# Altium PCB Стенд проверки шлейфов.PcbDoc (part 2 of 3)
Units mm, origin at the board's own origin, x right, y up, seen from the top; angles counter-clockwise.
Board outline 130 x 70 mm, 2 copper layers (Top Layer, Bottom Layer), stack 1.571 mm thick; 262 components, 230 nets, 835 pads, 564 vias.
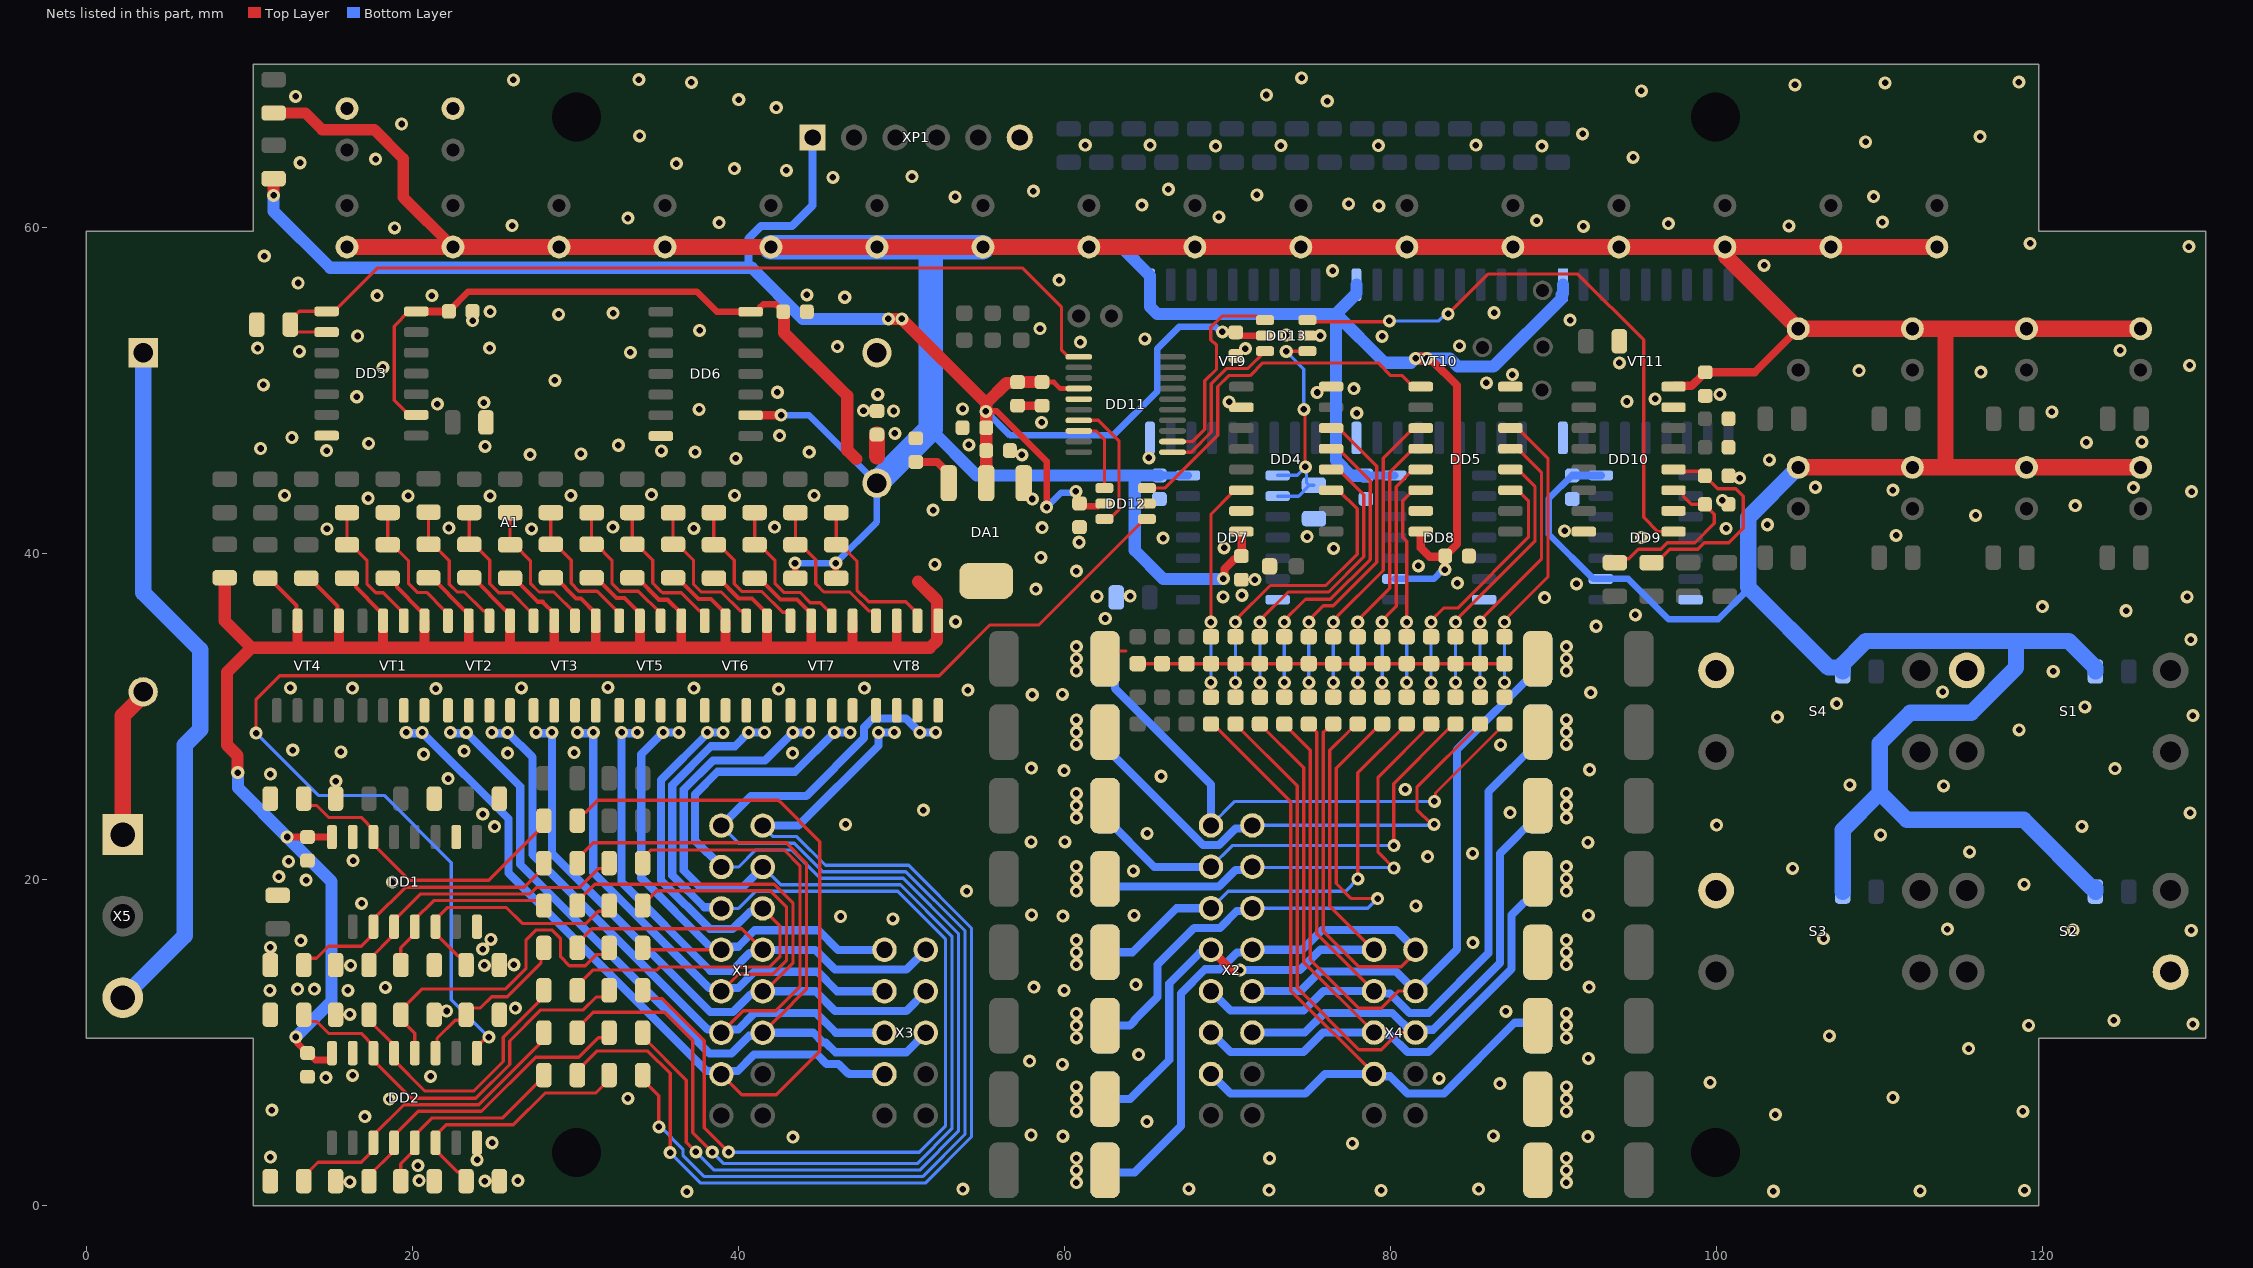
[diagram p2: the nets of this part, all layers, seen from the top]

## Via types
v1: diameter 0.8, hole 0.4, Top Layer to Bottom Layer, tented both sides, 564 vias

## Nets (pads, with @x,y where several pads share a name; then routed paths per layer and width w, separated by ;. In a path a pad name is that pad's centre, name@x,y a point inside that pad or via, vN(x,y) a via of type N, cw(c..) or ccw(c..) an arc to the next point about the centre after c; other vN are vias at no path point) (continued)
3.3V: C13.1 C14.1 C15.2 C16.1 C21.1 C22.1 DA1.2 DA1.4 DD11.4 DD12.5 DD13.5 R157.1 XP1.1 | length 108.1
  Top Layer w0.3: C16.1@58.625,50.5 59.35,50.5 59.75,50.1 DD11.4@60.875,50.1
  Top Layer w0.4: v1(55.181,48.707) 55.843,48.707 58.9,45.65 v1(58.9,42.825) ; v1(60.7,43.8) 60.777,43.723 60.777,43.201 C21.1@60.921,43.056 61.087,42.89 62.04,42.89 62.2,43.05 DD12.5@62.45,43.05 ; v1(69.678,53.572) 69.689,53.561 70.614,53.561 C22.1@70.625,53.55 ; C22.1@70.575,53.575 70.8,53.35 DD13.5@72.3,53.35
  Top Layer w0.75: v1(11.5,61.95) R157.1@11.5,62.975 ; v1(49.2,54.375) v1(50.025,54.375) 55.2,49.2 ; DA1.2@55.2,44.3 C13.1@55.2,46.3 C14.1@55.2,47.7 55.2,49.2 ; C16.1@58.625,50.5 C15.2@57.125,50.5 57.075,50.45 56.45,50.45 55.2,49.2
  Bottom Layer w0.4: v1(55.181,48.707) 56.663,47.225 62.981,47.225 65.7,49.944 65.7,52.55 67.05,53.9 69.243,53.9 69.571,53.572 v1(69.678,53.572) ; v1(58.9,42.825) 59.798,43.723 60.623,43.723 v1(60.7,43.8)
  Bottom Layer w0.5: 40.625,57.7 40.625,59.3 41.4,60.075 43.3,60.075 44.555,61.33 XP1.1@44.555,65.5
  Bottom Layer w0.75: v1(11.5,61.95) 11.5,60.975 14.97,57.505 38.951,57.505 38.959,57.513 39.766,57.513 39.774,57.505 40.82,57.505 43.95,54.375 v1(49.2,54.375) v1(50.025,54.375)
3_IN: R76.1 R87.1 X2.4 X4.4 | length 49
  Top Layer w0.2: R76.1@68.985,29.53 R76.1@69.01,29.53 ; R76.1@69.01,29.63 73.875,24.765 73.875,13.18 X4.4@78.985,8.07
  Bottom Layer w0.5: X2.4@68.985,8.07 70.185,6.87 74.77,6.87 75.97,8.07 X4.4@78.985,8.07 79.124,7.931 79.967,7.931 81.028,6.87 83.27,6.87 87.613,11.213 R87.1@89.025,11.213
3_OUT: R8.1 VT1.7 VT1.8 X1.4 X3.4 | length 78
  Top Layer w0.2: R8.1@30.125,23.6 30.125,23.875 30.35,24.1 30.625,24.1 31.375,24.85 42.45,24.85 42.55,24.75 42.566,24.75 45,22.316 45,9.475 42.325,6.8 40.22,6.8 X1.4@38.96,8.06
  Bottom Layer w0.5: v1@19.635,28.964 v1@20.605,28.964 ; v1(20.605,29.014) 25.9,23.719 25.9,20.4 38.049,8.251 38.769,8.251 X1.4@38.96,8.06 39.151,8.251 39.961,8.251 40.97,9.26 44.84,9.26 45.415,8.685 46.144,8.685 46.729,8.1 46.81,8.1 ; 46.81,8.06 X3.4@48.96,8.06
  other v1: 19.635,29.014
3_SIG: R18.1 R39.1 VT1.2 | length 8.5
  Top Layer w0.2: R39.1@16,42.5 R18.1@16,40.525 16.275,40.525 17.225,39.575 17.225,38.125 17.775,37.575 18.224,37.575 19.485,36.314 VT1.2@19.485,35.864
3А: DD1.14 R2.1 R8.2 | length 19
  Top Layer w0.2: R2.1@13.35,24.95 13.35,24.902 13.715,24.537 14.132,24.537 14.867,23.802 16.868,23.802 17.62,23.05 DD1.14@17.62,22.6 17.62,22.15 19.82,19.95 24.7,19.95 28.075,23.325 R8.2@28.075,23.6
3В: DD4.14 R73.1 R76.2 | length 14.4
  Top Layer w0.2: R76.2@68.985,31.18 v1@68.985,32.03 ; R73.1@68.985,34.88 v1@68.985,35.73 ; v1@68.985,35.88 68.985,42.396 70.2,43.611 70.2,43.643 70.427,43.87 DD4.14@70.85,43.87
  Bottom Layer w0.2: v1@68.985,32.18 v1@68.985,35.88
  other v1: 68.985,32.08 68.985,35.78
4_IN: R77.1 R89.1 X2.5 X4.5 | length 55.7
  Top Layer w0.2: R77.1@70.485,29.53 74.275,25.74 74.275,13.346 78.061,9.56 79.42,9.56 80.47,10.61 X4.5@81.525,10.61
  Bottom Layer w0.5: X2.5@71.525,10.61 74.735,10.61 75.935,11.81 80.1,11.81 81.3,10.61 X4.5@81.525,10.61 81.693,10.778 82.598,10.778 86.7,14.88 86.7,21.588 89.025,23.913 R89.1@89.025,24.713
4_OUT: R9.1 VT2.5 VT2.6 X1.5 X3.5 | length 68.4
  Top Layer w0.2: R9.1@30.125,21 30.125,21.275 31.1,22.25 42.925,22.25 44.175,21 44.175,13.259 42.466,11.55 42.45,11.55 X1.5@41.5,10.6
  Bottom Layer w0.5: v1@22.345,28.964 v1@23.315,28.964 ; v1(23.315,29.014) 26.625,25.704 26.625,20.925 38.225,9.325 39.575,9.325 40.659,10.409 41.309,10.409 X1.5@41.5,10.6 44.594,10.6 45.194,10 45.356,10 45.956,9.4 50.3,9.4 X3.5@51.5,10.6
  other v1: 22.345,29.014
4_SIG: R19.1 R44.1 VT2.4 | length 8.7
  Top Layer w0.2: R44.1@18.5,42.5 R19.1@18.5,40.525 18.775,40.525 19.775,39.525 19.775,38.125 20.3,37.6 20.882,37.6 21.968,36.514 22.195,36.287 VT2.4@22.195,35.864
4А: DD1.3 R3.1 R9.2 | length 18
  Top Layer w0.2: R3.1@13.35,14.75 13.35,14.798 13.715,15.162 14.132,15.162 14.867,15.898 16.868,15.898 17.62,16.65 DD1.3@17.62,17.1 17.62,17.55 19.595,19.525 26.875,19.525 28.075,20.725 R9.2@28.075,21
4В: DD4.3 R74.1 R77.2 | length 19.4
  Top Layer w0.2: R77.2@70.485,31.18 v1@70.485,32.03 ; R74.1@70.485,34.88 v1@70.485,35.73 ; v1@70.485,35.88 72.63,38.025 76.031,38.025 77.95,39.944 77.95,42.72 76.8,43.87 DD4.3@76.35,43.87
  Bottom Layer w0.2: v1@70.485,32.18 v1@70.485,35.88
  other v1: 70.485,32.08 70.485,35.78
5_IN: R78.1 R91.1 X2.6 X4.6 | length 50.2
  Top Layer w0.2: R78.1@71.985,29.53 74.675,26.84 74.675,14.92 X4.6@78.985,10.61
  Bottom Layer w0.5: X2.6@68.985,10.61 70.185,9.41 74.66,9.41 75.86,10.61 X4.6@78.985,10.61 79.124,10.471 79.967,10.471 81.028,9.41 82.335,9.41 87.425,14.5 87.425,17.813 89.025,19.413 R91.1@89.025,20.213
5_OUT: R10.1 VT2.7 VT2.8 X1.6 X3.6 | length 60.1
  Top Layer w0.2: R10.1@34.125,21 34.125,21.275 34.66,21.81 42.799,21.81 43.775,20.834 43.775,13.425 42.3,11.95 40.31,11.95 X1.6@38.96,10.6
  Bottom Layer w0.5: v1@24.885,28.964 v1@25.855,28.964 ; v1(25.855,29.014) 27.375,27.494 27.375,21.525 38.109,10.791 38.769,10.791 X1.6@38.96,10.6 39.151,10.791 39.994,10.791 41.003,11.8 44.775,11.8 45.975,10.6 X3.6@48.96,10.6
  other v1: 24.885,29.014
5_SIG: R20.1 R40.1 VT2.2 | length 8.7
  Top Layer w0.2: R40.1@21,42.525 R20.1@21,40.55 21.275,40.55 22.275,39.55 22.275,38.1 22.75,37.625 23.2,37.625 24.355,36.47 24.539,36.47 24.735,36.274 VT2.2@24.735,35.864
5V: A1.3 C1.1 C2.1 C3.1 C4.1 C5.1 C6.1 C7.1 C8.1 C9.1 C10.1 C11.1 C12.1 DA1.3 DD1.16 DD2.16 DD3.9 DD3.14 DD4.16 DD5.16 DD6.9 DD6.14 DD7.9 DD7.14 DD8.9 DD8.14 DD9.9 DD9.14 DD10.16 HL1.2 HL2.2 HL3.2 HL4.2 HL5.2 HL6.2 HL7.2 HL8.2 HL9.2 HL10.2 HL11.2 HL12.2 HL13.2 HL14.2 HL15.2 HL16.2 HL17.2 HL18.2 HL19.2 HL20.2 HL21.2 HL22.2 HL23.2 HL24.2 R17.2 R18.2 R19.2 R20.2 R21.2 R22.2 R35.2 R36.2 R46.2 R47.2 R48.2 R49.2 R50.2 R51.2 R71.2 R72.2 R158.1 R169.1 R170.1 R171.1 R172.1 VT1.1 VT1.3 VT2.1 VT2.3 VT3.1 VT3.3 VT4.1 VT4.3 VT5.1 VT5.3 VT6.1 VT6.3 VT7.1 VT7.3 VT8.1 VT8.3 VT9.10 VT10.10 VT11.10 | length 635.7
  Top Layer w0.2: DD2.16@14.884,8.925 15.08,9.121 DD2.16@15.08,9.35 ; DD3.9@20.25,48.485 19.8,48.485 18.9,49.385 18.9,53.935 19.8,54.835 DD3.14@20.25,54.835
  Top Layer w0.25: R36.2@11,38.475 11.214,38.475 12.899,36.79 12.899,35.93 VT4.3@12.965,35.864 ; 12.945,34.2 12.965,34.22 ; R17.2@13.5,38.475 13.714,38.475 15.419,36.77 15.419,35.95 VT4.1@15.505,35.864 ; R18.2@16,38.475 16.214,38.475 16.555,38.134 16.555,37.92 18.001,36.474 18.042,36.474 18.215,36.301 VT1.3@18.215,35.864 ; R19.2@18.5,38.475 18.714,38.475 19.055,38.134 19.055,37.92 20.501,36.474 20.582,36.474 20.755,36.301 VT1.1@20.755,35.864 ; R20.2@21,38.5 21.214,38.5 23.24,36.474 23.292,36.474 23.465,36.301 VT2.3@23.465,35.864 ; R21.2@23.5,38.5 23.714,38.5 25.74,36.474 25.832,36.474 26.005,36.301 VT2.1@26.005,35.864 ; R22.2@26,38.475 26.25,38.475 27.7,37.025 28.004,37.025 28.715,36.314 VT3.3@28.715,35.864 ; R46.2@28.5,38.5 28.775,38.5 30.05,37.225 30.344,37.225 31.255,36.314 VT3.1@31.255,35.864 ; R47.2@31,38.5 31.275,38.5 32.525,37.25 33.029,37.25 33.965,36.314 VT5.3@33.965,35.864 ; R48.2@33.5,38.5 33.775,38.5 35.125,37.15 35.669,37.15 36.505,36.314 VT5.1@36.505,35.864 ; R49.2@36,38.5 36.249,38.5 37.549,37.2 38.329,37.2 39.215,36.314 VT6.3@39.215,35.864 ; R50.2@38.5,38.475 38.775,38.475 40.025,37.225 40.844,37.225 41.755,36.314 VT6.1@41.755,35.864 ; R51.2@41,38.475 41.275,38.475 42.575,37.175 43.604,37.175 44.465,36.314 VT7.3@44.465,35.864
  Top Layer w0.4: v1(12.325,22.6) C1.1@13.58,22.6 DD1.16@15.08,22.6 ; v1(12.863,10.336) 12.939,10.259 12.939,9.981 13.33,9.59 13.33,9.582 13.562,9.35 C2.1@13.57,9.35 ; C2.1@13.623,9.35 14.048,8.925 DD2.16@14.884,8.925 ; C5.1@22.25,54.835 22.25,54.86 23.44,56.05 37.45,56.05 38.69,54.81 41.2,54.81 41.3,54.91 41.3,55.041 41.534,55.275 42.285,55.275 42.508,55.052 42.526,55.052 42.75,54.828 C6.1@42.75,54.81 ; v1(43.475,39.4) 43.487,39.388 43.487,38.488 R71.2@43.5,38.475 ; v1(45.975,39.4) 45.987,39.388 45.987,38.488 R72.2@46,38.475
  Top Layer w0.5: DD3.14@20.25,54.835 C5.1@22.25,54.835 ; DD6.9@40.75,48.46 40.758,48.468 42.617,48.468 v1(42.625,48.475) ; C11.1@50.875,45.6 52.2,45.6 52.9,44.9 DA1.3@52.9,44.3 ; v1(69.75,38.45) 69.807,38.507 69.807,39.032 70.43,39.655 70.675,39.655 C3.1@70.85,39.83 ; C3.1@70.875,39.83 DD4.16@70.875,41.33 ; DD5.16@81.85,41.33 81.85,41.282 81.852,41.28 81.852,40.323 82.384,39.791 83.175,39.791 83.214,39.83 C4.1@83.35,39.83 ; v1(82.219,51.95) 82.301,51.95 82.451,51.8 82.582,51.8 84.075,50.307 84.075,40.563 83.875,40.363 83.875,40.355 83.55,40.03 83.525,40.03 83.35,39.855 C4.1@83.35,39.83 ; v1(83.325,39) 83.337,39.013 83.337,39.818 C4.1@83.35,39.83 ; DD10.16@97.35,50.22 97.4,50.27 98.462,50.27 98.767,50.575 98.775,50.575 99.1,50.9 99.1,50.925 99.275,51.1 C12.1@99.3,51.1 102.33,51.1 HL21.2@105,53.77
  Top Layer w0.6: 12.965,34.22 VT4.3@12.965,35.864 ; VT4.1@15.505,35.864 15.505,34.22 15.525,34.2 ; VT1.3@18.215,35.864 18.215,34.23 18.245,34.2 ; 20.6,34.2 20.755,34.355 VT1.1@20.755,35.864 ; 23.4,34.2 23.465,34.265 VT2.3@23.465,35.864 ; 26,34.2 26.005,34.205 VT2.1@26.005,35.864 ; 28.45,34.2 28.715,34.465 VT3.3@28.715,35.864 ; 31.175,34.2 31.255,34.28 VT3.1@31.255,35.864 ; 33.901,34.2 33.965,34.264 VT5.3@33.965,35.864 ; 36.372,34.2 36.505,34.332 VT5.1@36.505,35.864 ; 39.15,34.2 39.215,34.265 VT6.3@39.215,35.864 ; VT6.1@41.755,35.864 41.755,34.288 41.843,34.2 ; 44.252,34.2 44.465,34.413 VT7.3@44.465,35.864 ; 46.904,34.2 47.005,34.301 VT7.1@47.005,35.864 ; 49.667,34.2 49.715,34.248 VT8.3@49.715,35.864
  Top Layer w0.7: R158.1@11.5,67 13.45,67 14.47,65.98 17.67,65.98 19.442,64.208 19.442,61.838 HL2.2@22.5,58.78
  Top Layer w0.75: R35.2@8.5,38.5 8.5,37.425 8.5,36.65 8.5,35.85 10.15,34.2 ; v1(9.3,26.55) 9.29,26.56 9.29,27.599 8.65,28.24 8.65,32.7 10.15,34.2 ; C6.1@42.75,54.81 42.8,54.76 42.8,53.53 46.675,49.655 46.675,46.325 47.225,45.775 ; 51.025,38.25 52.18,37.095 52.18,34.639 51.741,34.2 49.667,34.2 46.904,34.2 44.252,34.2 41.843,34.2 39.15,34.2 36.372,34.2 33.901,34.2 31.175,34.2 28.45,34.2 26,34.2 23.4,34.2 20.6,34.2 18.245,34.2 15.525,34.2 12.945,34.2 10.15,34.2 ; v1(81.535,51.95) v1(82.219,51.95)
  Top Layer w1: HL1.2@16,58.78 HL2.2@22.5,58.78 HL3.2@29,58.78 HL4.2@35.5,58.78 HL5.2@42,58.78 HL6.2@48.5,58.78 HL7.2@55,58.78 HL8.2@61.5,58.78 HL9.2@68,58.78 HL10.2@74.5,58.78 HL11.2@81,58.78 HL12.2@87.5,58.78 HL13.2@94,58.78 HL14.2@100.5,58.78 ; 48.5,45.95 C10.1@48.5,47.275 ; HL17.2@105,45.27 HL18.2@112,45.27 114.065,45.27 ; HL16.2@113.5,58.78 HL15.2@107,58.78 HL14.2@100.5,58.78 ; HL20.2@126,45.27 HL19.2@119,45.27 114.065,45.27 ; HL24.2@126,53.77 114.025,53.77 ; HL14.2@100.5,58.78 100.577,58.703 100.577,58.193 HL21.2@105,53.77 114.025,53.77 ; 114.025,53.77 114.025,45.31 114.065,45.27
  Bottom Layer w0.4: v1(42.625,48.475) 44.325,48.475 A1.3@48.5,44.3 48.5,41.925 v1(45.975,39.4) v1(43.475,39.4) ; DD8.9@80.235,38.425 82.642,38.425 83.217,39 v1(83.325,39) ; C9.1@91.145,44.775 91.12,44.775 89.7,43.355 89.7,41.17 92.445,38.425 DD9.9@92.895,38.425 94.575,38.425 97.05,35.95 100.1,35.95 101.925,37.775 101.925,37.925
  Bottom Layer w0.5: C7.1@65.825,44.775 DD7.14@67.575,44.775 ; C8.1@78.485,44.775 DD8.14@80.235,44.775 ; C9.1@91.145,44.775 DD9.14@92.895,44.775
  Bottom Layer w0.75: v1(9.3,26.55) 9.31,26.54 9.31,25.615 v1(12.325,22.6) 15.05,19.875 15.05,12.523 v1(12.863,10.336) ; 51.8,47.6 54.625,44.775 64.305,44.775 ; HL8.2@61.5,58.78 63.49,58.78 65.245,57.025 65.245,55.114 65.684,54.675 76.655,54.675 ; C7.1@65.825,44.775 64.305,44.775 ; v1(69.75,38.45) 69.736,38.45 69.711,38.425 66.06,38.425 64.305,40.18 64.305,44.775 ; VT10.10@77.905,56.475 77.905,55.925 76.655,54.675 ; C8.1@78.47,44.76 77.585,44.76 76.655,45.69 76.655,54.675 ; VT11.10@90.565,56.475 90.565,55.925 90.49,55.85 90.49,55.628 86.312,51.45 84.116,51.45 83.626,51.94 82.229,51.94 v1(82.219,51.95) 81.522,51.95 81.258,51.687 79.643,51.687 76.655,54.675
  Bottom Layer w1: HL17.2@105,45.27 101.925,42.195 101.925,37.925 106.85,33 R172.1@107.7,33 ; R171.1@107.725,19.25 107.725,23.028 110.002,25.304 ; R172.1@107.725,32.75 107.725,33.2 109.14,34.615 118.35,34.615 ; R170.1@123.225,19.25 123.225,19.475 123.2,19.5 122.975,19.5 118.825,23.65 111.656,23.65 110.002,25.304 ; R169.1@123.225,32.75 123.225,32.975 121.585,34.615 118.35,34.615 ; 110.002,25.304 110.002,28.352 111.875,30.225 115.6,30.225 118.35,32.975 118.35,34.615
  Bottom Layer w1.5: HL5.2@42,58.78 HL6.2@48.5,58.78 51.775,58.78 ; A1.3@48.5,44.3 51.8,47.6 51.8,58.755 51.775,58.78 ; HL7.2@55,58.78 51.775,58.78
5А: DD1.4 R4.1 R10.2 | length 18
  Top Layer w0.2: R4.1@17.35,14.75 17.35,15.083 18.89,16.623 18.89,17.523 19.117,17.75 19.149,17.75 20.499,19.1 27.194,19.1 27.594,19.5 30.25,19.5 31.417,20.667 31.742,20.667 R10.2@32.075,21
5В: DD4.4 R75.1 R78.2 | length 19.8
  Top Layer w0.2: R78.2@71.985,31.18 v1@71.985,32.03 ; R75.1@71.985,34.88 v1@71.985,35.73 ; v1@71.985,35.88 73.73,37.625 76.197,37.625 78.35,39.778 78.35,43.59 76.8,45.14 DD4.4@76.35,45.14
  Bottom Layer w0.2: v1@71.985,32.18 v1@71.985,35.88
  other v1: 71.985,32.08 71.985,35.78
6_IN: R98.1 R103.1 X2.7 X4.7 | length 57.9
  Top Layer w0.2: R98.1@73.485,29.515 75.075,27.925 75.075,15.086 78.061,12.1 79.42,12.1 80.47,13.15 X4.7@81.525,13.15
  Bottom Layer w0.5: X2.7@71.525,13.15 74.475,13.15 75.675,14.35 80.325,14.35 X4.7@81.525,13.15 84.075,15.7 84.075,27.963 89.025,32.913 R103.1@89.025,33.713
6_OUT: R11.1 VT3.5 VT3.6 X1.7 X3.7 | length 57.5
  Top Layer w0.2: R11.1@30.125,18.4 30.125,18.65 31.185,19.71 42.198,19.71 43.35,18.558 43.35,14.859 41.631,13.14 X1.7@41.5,13.14
  Bottom Layer w0.5: v1@27.595,28.964 v1@28.565,28.964 ; v1(28.565,29.014) 28.565,21.585 38.275,11.875 39.675,11.875 40.749,12.949 41.309,12.949 X1.7@41.5,13.14 44.735,13.14 45.935,11.94 50.3,11.94 X3.7@51.5,13.14
  other v1: 27.595,29.014
6_SIG: R21.1 R45.1 VT3.4 | length 8.6
  Top Layer w0.2: R45.1@23.5,42.5 R21.1@23.5,40.55 23.775,40.55 24.75,39.575 24.75,38.125 25.3,37.575 26.1,37.575 27.192,36.483 27.249,36.483 27.479,36.253 VT3.4@27.479,36.196
6А: DD1.5 R5.1 R11.2 | length 11.7
  Top Layer w0.2: R5.1@19.3,14.75 19.3,15.8 20.16,16.66 DD1.5@20.16,17.1 20.16,17.55 21.31,18.7 27.775,18.7 R11.2@28.075,18.4
6В: DD4.5 R93.1 R98.2 | length 20.3
  Top Layer w0.2: R98.2@73.485,31.18 v1@73.485,32.03 ; R93.1@73.485,34.88 v1@73.485,35.73 ; v1@73.485,35.88 74.78,37.175 76.312,37.175 78.75,39.613 78.75,44.46 76.8,46.41 DD4.5@76.35,46.41
  Bottom Layer w0.2: v1@73.485,32.18 v1@73.485,35.88
  other v1: 73.485,32.08 73.485,35.78
7_IN: R99.1 R105.1 X2.8 X4.8 | length 53.2
  Top Layer w0.2: R99.1@74.985,29.63 74.985,29.528 75.475,29.038 75.475,16.66 X4.8@78.985,13.15
  Bottom Layer w0.5: X2.8@68.985,13.15 70.185,11.95 74.675,11.95 75.875,13.15 X4.8@78.985,13.15 79.124,13.011 79.967,13.011 81.163,11.815 82.34,11.815 86,15.475 86,25.388 89.025,28.413 R105.1@89.025,29.213
7_OUT: R12.1 VT3.7 VT3.8 X1.8 X3.8 | length 49.1
  Top Layer w0.2: R12.1@34.125,18.4 34.125,18.448 34.987,19.31 41.965,19.31 42.95,18.325 42.95,15.025 42.115,14.19 40.01,14.19 X1.8@38.96,13.14
  Bottom Layer w0.5: v1@30.135,28.964 v1@31.105,28.964 ; v1(31.105,29.014) 31.105,20.42 38.194,13.331 38.769,13.331 X1.8@38.96,13.14 39.151,13.331 39.994,13.331 41.003,14.34 44.86,14.34 46.06,13.14 X3.8@48.96,13.14
  other v1: 30.135,29.014
7_SIG: R22.1 R41.1 VT3.2 | length 9
  Top Layer w0.2: R41.1@26,42.5 R22.1@26,40.525 26.275,40.525 27.25,39.55 27.25,38.15 27.775,37.625 28.674,37.625 29.985,36.314 VT3.2@29.985,35.864
7А: DD1.6 R6.1 R12.2 | length 15.5
  Top Layer w0.2: R6.1@23.3,14.75 23.3,14.951 22.935,15.315 22.792,15.315 21.43,16.677 21.43,17.55 22.155,18.275 25.781,18.275 26.756,17.3 30.675,17.3 31.417,18.042 31.717,18.042 R12.2@32.075,18.4
7В: DD4.6 R94.1 R99.2 | length 20.7
  Top Layer w0.2: R99.2@74.985,31.18 v1@74.985,32.03 ; R94.1@74.985,34.88 v1@74.985,35.73 ; v1@74.985,35.88 75.88,36.775 76.478,36.775 79.15,39.447 79.15,45.35 76.953,47.547 76.483,47.547 DD4.6@76.35,47.68
  Bottom Layer w0.2: v1@74.985,32.18 v1@74.985,35.88
  other v1: 74.985,32.08 74.985,35.78
8_IN: R100.1 R107.1 X2.9 X4.9 | length 50.6
  Top Layer w0.2: 76.01,29.155 75.875,29.02 75.875,16.826 78.061,14.64 80.647,14.64 81.525,15.518 X4.9@81.525,15.69 ; 76.011,29.155 R100.1@76.485,29.629
  Bottom Layer w0.5: R107.1@62.485,2.03 64.307,2.03 67.15,4.873 67.15,13.012 68.628,14.49 69.54,14.49 70.572,15.522 71.357,15.522 X2.9@71.525,15.69 74.59,15.69 75.79,16.89 80.325,16.89 X4.9@81.525,15.69
8_OUT: R29.1 VT5.5 VT5.6 X1.9 X3.9 | length 45.1
  Top Layer w0.2: R29.1@30.125,15.8 30.125,16.075 31.022,16.972 40.208,16.972 X1.9@41.5,15.68
  Bottom Layer w0.5: v1@32.845,28.964 v1@33.815,28.964 ; v1(32.845,29.014) 32.845,19.83 38.275,14.4 39.6,14.4 40.689,15.489 41.309,15.489 X1.9@41.5,15.68 44.72,15.68 45.92,14.48 50.3,14.48 X3.9@51.5,15.68
  other v1: 33.815,29.014
8_SIG: R46.1 R79.1 VT5.4 | length 8.6
  Top Layer w0.2: R79.1@28.5,42.5 R46.1@28.5,40.55 28.775,40.55 29.75,39.575 29.75,38.15 30.225,37.675 31.334,37.675 VT5.4@32.624,36.385
8А: DD2.11 R23.1 R29.2 | length 10.2
  Top Layer w0.2: DD2.11@21.43,9.35 21.521,9.441 21.521,10.246 22.642,11.367 22.967,11.367 R23.1@23.3,11.7 ; R23.1@23.3,11.748 23.665,12.113 24.182,12.113 24.869,12.8 25.825,12.8 27.895,14.87 27.895,15.62 R29.2@28.075,15.8
8В: DD5.11 R95.1 R100.2 | length 19.6
  Top Layer w0.2: R100.2@76.485,31.18 v1@76.485,32.03 ; R95.1@76.485,34.88 v1@76.485,35.73 ; v1@76.485,35.88 79.55,38.945 79.55,45.83 81.4,47.68 DD5.11@81.85,47.68
  Bottom Layer w0.2: v1@76.472,35.754 76.485,35.74 v1@76.485,32.18
  other v1: 76.485,32.08 76.485,35.78
9_IN: R101.1 R109.1 X2.10 X4.10 | length 39.9
  Top Layer w0.2: R101.1@77.985,29.629 77.511,29.155 76.275,27.92 76.275,18.35 78.935,15.69 X4.10@78.985,15.69
  Top Layer w0.5: X2.10@68.985,15.69 70.24,14.435 v1(70.775,14.435)
  Bottom Layer w0.5: R109.1@62.485,6.53 64.03,6.53 66.425,8.925 66.425,13.625 68.299,15.499 68.794,15.499 X2.10@68.985,15.69 ; v1(70.775,14.435) 74.45,14.435 75.705,15.69 X4.10@78.985,15.69
9_OUT: R30.1 VT5.7 VT5.8 X1.10 X3.10 | length 33.1
  Top Layer w0.2: R30.1@34.125,15.8 34.245,15.68 X1.10@38.96,15.68
  Bottom Layer w0.5: v1(36.355,29.014) v1(35.385,29.014) 34.05,27.679 34.05,20.075 38.254,15.871 38.769,15.871 X1.10@38.96,15.68 39.151,15.871 39.994,15.871 41.003,16.88 44.92,16.88 46.12,15.68 X3.10@48.96,15.68
9_SIG: R47.1 R83.1 VT5.2 | length 9.2
  Top Layer w0.2: R83.1@31,42.475 R47.1@31,40.55 31.275,40.55 32.25,39.575 32.25,38.15 32.725,37.675 33.874,37.675 35.235,36.314 VT5.2@35.235,35.864
9А: DD2.12 R24.1 R30.2 | length 20.8
  Top Layer w0.2: R24.1@19.3,11.425 20.16,10.565 DD2.12@20.16,9.35 DD2.12@20.16,8.9 ; R24.1@19.3,12.025 19.35,12.025 20.611,13.286 25.745,13.286 26.975,14.516 26.975,16.281 27.594,16.9 28.556,16.9 29.1,16.356 29.1,15.244 29.644,14.7 30.606,14.7 31.293,15.388 31.71,15.388 32.075,15.752 R30.2@32.075,15.8
9В: DD5.12 R96.1 R101.2 | length 17.8
  Top Layer w0.2: R101.2@77.985,31.18 v1@77.985,32.03 ; R96.1@77.985,34.88 v1@77.985,35.73 ; v1@77.985,35.88 79.95,37.845 79.95,44.96 81.4,46.41 DD5.12@81.85,46.41
  Bottom Layer w0.2: v1@77.985,32.18 v1@77.985,35.88
  other v1: 77.985,32.08 77.985,35.78
10_IN: R102.1 R111.1 X2.11 | length 35.1
  Top Layer w0.2: v1(79.2,18.825) 77.6,18.825 76.675,19.75 76.675,26.82 79.01,29.155 R102.1@79.485,29.629
  Bottom Layer w0.2: X2.11@71.525,18.23 78.605,18.23 v1(79.2,18.825)
  Bottom Layer w0.5: R111.1@62.485,11.03 64.007,11.03 64.3,11.323 64.3,11.371 65.715,12.786 65.715,14.79 67.955,17.03 69.53,17.03 70.567,18.067 71.362,18.067 X2.11@71.525,18.23
10_OUT: R31.1 VT6.5 VT6.6 X1.11 | length 36.1
  Top Layer w0.2: R31.1@30.125,13.2 30.125,13.475 31.1,14.45 35.035,14.45 35.215,14.63 41.935,14.63 42.55,15.245 42.55,17.17 X1.11@41.5,18.22
  Bottom Layer w0.5: v1(39.065,29.014) v1(38.095,29.014) 38.095,28.933 35.25,26.088 35.25,19.96 35.325,19.885 35.325,19.875 38.25,16.95 39.65,16.95 40.729,18.029 41.309,18.029 X1.11@41.5,18.22
10_SIG: R48.1 R80.1 VT6.4 | length 9.4
  Top Layer w0.2: R80.1@33.5,42.5 R48.1@33.5,40.55 33.775,40.55 34.75,39.575 34.75,38.175 34.9,38.025 34.9,38.019 35.244,37.675 35.25,37.675 35.35,37.575 36.5,37.575 37.592,36.483 37.749,36.483 37.945,36.287 VT6.4@37.945,35.864
10А: DD2.13 R25.1 R31.2 | length 16.8
  Top Layer w0.2: R25.1@17.35,11.7 17.35,11.367 18.89,9.827 DD2.13@18.89,9.35 18.89,8.9 20.765,7.025 23.775,7.025 25.584,8.834 25.584,10.334 R31.2@27.9,12.65 ; R31.2@28.075,12.851 R31.2@28.075,13.2
10В: DD5.13 R97.1 R102.2 | length 15.9
  Top Layer w0.2: R102.2@79.485,31.18 v1@79.485,32.03 ; R97.1@79.485,34.88 v1@79.485,35.73 ; v1@79.485,35.88 80.35,36.745 80.35,44.09 81.4,45.14 DD5.13@81.85,45.14
  Bottom Layer w0.2: v1@79.485,32.18 v1@79.485,35.88
  other v1: 79.485,32.08 79.485,35.78
11_IN: R118.1 R123.1 X2.12 | length 28.1
  Top Layer w0.2: v1(77.991,20.035) 77.991,26.536 R118.1@80.985,29.53
  Bottom Layer w0.2: X2.12@68.985,18.23 70.035,19.28 77.236,19.28 v1(77.991,20.035)
  Bottom Layer w0.5: R123.1@62.485,15.53 64.17,15.53 66.87,18.23 X2.12@68.985,18.23
11_OUT: R32.1 VT6.7 VT6.8 X1.12 | length 69.9
  Top Layer w0.2: R32.1@34.125,13.2 34.125,12.925 34.35,12.7 35.313,12.7 37.91,10.103 37.91,4.765 v1(39.4,3.275)
  Bottom Layer w0.2: X1.12@38.96,18.22 40.015,18.22 41.065,19.27 49.78,19.27 52.7,16.35 52.7,4.875 51.1,3.275 v1(39.4,3.275)
  Bottom Layer w0.5: X1.12@38.96,18.22 38.889,18.291 37.909,18.291 35.95,20.25 35.95,25.798 38.316,28.164 39.785,28.164 v1(40.635,29.014) v1(41.605,29.014)
11_SIG: R49.1 R84.1 VT6.2 | length 9.5
  Top Layer w0.2: R84.1@36,42.475 R49.1@36,40.55 36.275,40.55 37.25,39.575 37.25,38.1 37.725,37.625 38.95,37.625 40.105,36.47 40.289,36.47 40.485,36.274 VT6.2@40.485,35.864
11А: DD2.14 R26.1 R32.2 | length 25
  Top Layer w0.2: R26.1@13.35,11.7 13.35,11.652 13.715,11.288 14.132,11.288 14.867,10.552 16.868,10.552 17.62,9.8 DD2.14@17.62,9.35 17.62,8.9 19.945,6.575 23.909,6.575 25.984,8.649 25.984,10.09 27.89,11.995 30.501,11.995 31.293,12.788 31.71,12.788 32.075,13.152 R32.2@32.075,13.2
11В: DD5.14 R113.1 R118.2 | length 15.1
  Top Layer w0.2: R118.2@80.985,31.18 v1@80.985,32.03 ; R113.1@80.985,34.874 v1(80.985,35.78) ; R113.1@80.985,34.88 v1@80.985,35.73 ; v1@80.985,35.88 80.985,40.738 80.75,40.973 80.75,43.22 81.4,43.87 DD5.14@81.85,43.87
  Bottom Layer w0.2: v1@80.985,32.18 v1@80.985,35.88
  other v1: 80.985,32.08
12_IN: R119.1 R125.1 X2.13 | length 29
  Top Layer w0.2: v1(80.2,20.7) 79.23,21.67 79.23,26.275 R119.1@82.485,29.53
  Bottom Layer w0.2: X2.13@71.525,20.77 71.56,20.735 80.165,20.735 v1(80.2,20.7)
  Bottom Layer w0.5: R125.1@62.485,20.03 62.945,19.57 69.482,19.57 70.491,20.579 71.334,20.579 X2.13@71.525,20.77
12_OUT: R33.1 VT7.5 VT7.6 X1.13 | length 76.8
  Top Layer w0.2: R33.1@30.125,10.6 30.125,10.875 31.1,11.85 35.475,11.85 37.2,10.125 37.2,4.475 v1(38.4,3.275)
  Bottom Layer w0.2: v1(38.4,3.275) 39.1,2.575 50.966,2.575 53.1,4.709 53.1,16.516 49.946,19.67 42.59,19.67 X1.13@41.5,20.76
  Bottom Layer w0.5: X1.13@41.5,20.76 40.215,19.475 37.715,19.475 36.65,20.54 36.65,25.508 38.442,27.3 41.631,27.3 v1(43.345,29.014) v1(44.315,29.014)
12_SIG: R50.1 R81.1 VT7.4 | length 9.6
  Top Layer w0.2: R81.1@38.5,42.5 R50.1@38.5,40.525 38.8,40.525 39.75,39.575 39.75,38.125 40.2,37.675 40.219,37.675 40.244,37.65 41.45,37.65 42.722,36.378 42.999,36.378 43.195,36.182 VT7.4@43.195,35.864
12А: DD2.3 R27.1 R33.2 | length 19.4
  Top Layer w0.2: R27.1@13.35,1.5 13.35,1.775 14.223,2.648 16.868,2.648 17.62,3.4 DD2.3@17.62,3.85 17.62,4.3 19.495,6.175 24.075,6.175 27.785,9.885 27.785,10.31 R33.2@28.075,10.6
12В: DD5.3 R114.1 R119.2 | length 17.1
  Top Layer w0.2: R119.2@82.485,31.18 v1@82.485,32.03 ; R114.1@82.485,34.88 v1@82.485,35.73 ; v1@82.485,35.88 83.245,36.64 84.117,36.64 88.45,40.973 88.45,43.22 87.8,43.87 DD5.3@87.35,43.87
  Bottom Layer w0.2: v1@82.485,32.18 v1@82.485,35.88
  other v1: 82.485,32.08 82.485,35.78
13_IN: R120.1 R127.1 X2.14 | length 29.3
  Top Layer w0.2: v1(80.2,22.075) 80.2,25.875 83.49,29.165 83.52,29.165 83.886,29.53 R120.1@83.985,29.53
  Bottom Layer w0.2: X2.14@68.985,20.77 70.29,22.075 v1(80.2,22.075)
  Bottom Layer w0.5: R127.1@62.485,24.53 62.485,23.79 65.505,20.77 X2.14@68.985,20.77
13_OUT: R34.1 VT7.7 VT7.8 X1.14 | length 71.6
  Top Layer w0.2: R34.1@34.125,10.6 34.125,10.367 36.8,7.692 36.8,3.885 v1(37.4,3.285)
  Bottom Layer w0.2: v1(37.4,3.285) 38.51,2.175 51.131,2.175 53.5,4.544 53.5,16.681 50.111,20.07 45.014,20.07 43.274,21.81 41.065,21.81 40.015,20.76 X1.14@38.96,20.76
  Bottom Layer w0.5: X1.14@38.96,20.78 37.35,22.39 37.35,25.218 38.732,26.6 43.471,26.6 v1(45.885,29.014) v1(46.855,29.014)
13_SIG: R51.1 R85.1 VT7.2 | length 9.7
  Top Layer w0.2: R85.1@41,42.5 R51.1@41,40.525 41.275,40.525 42.25,39.55 42.25,38.125 42.775,37.6 43.78,37.6 44.416,36.964 45.032,36.964 45.482,36.514 45.508,36.514 45.735,36.287 VT7.2@45.735,35.864
13А: DD2.4 R28.1 R34.2 | length 19.2
  Top Layer w0.2: R28.1@17.35,1.5 17.35,1.833 18.89,3.373 DD2.4@18.89,3.85 18.89,4.3 20.365,5.775 24.25,5.775 27.575,9.1 30.225,9.1 31.417,10.292 31.767,10.292 R34.2@32.075,10.6
13В: DD5.4 R115.1 R120.2 | length 17.1
  Top Layer w0.2: R120.2@83.985,31.18 v1@83.985,32.03 ; R115.1@83.985,34.88 v1@83.985,35.73 ; v1@83.985,35.88 88.85,40.745 88.85,44.1 DD5.4@87.81,45.14
  Bottom Layer w0.2: v1@83.985,32.18 v1@83.985,35.88
  other v1: 83.985,32.08 83.985,35.78
14_IN: R121.1 R129.1 X2.15 | length 32.7
  Top Layer w0.2: v1(82.675,23.375) 82.513,23.375 81.612,24.275 81.612,25.657 R121.1@85.485,29.53
  Bottom Layer w0.2: X2.15@71.525,23.31 71.533,23.318 82.618,23.318 v1(82.675,23.375)
  Bottom Layer w0.5: R129.1@62.44,29.27 62.967,28.743 62.967,27.631 68.488,22.11 69.482,22.11 70.491,23.119 71.334,23.119 X2.15@71.525,23.31
14_OUT: R55.1 VT8.5 VT8.6 X1.15 | length 71.5
  Top Layer w0.2: R55.1@30.125,8 30.125,8.275 31.325,9.475 34.451,9.475 35.822,8.105 v1(35.822,3.242)
  Bottom Layer w0.2: v1(35.822,3.242) 37.688,1.375 51.466,1.375 54.3,4.209 54.3,17.013 50.443,20.87 45.346,20.87 43.591,22.625 42.144,22.625 41.5,23.269 X1.15@41.5,23.3
  Bottom Layer w0.5: X1.15@41.5,23.3 43.7,23.3 48.595,28.195 v1(48.595,29.014) v1(49.565,29.014)
14_SIG: R71.1 R82.1 VT8.4 | length 9.3
  Top Layer w0.2: R82.1@43.5,42.5 R71.1@43.5,40.525 43.825,40.525 44.75,39.6 44.75,38.125 45.25,37.625 46.825,37.625 47.986,36.464 VT8.4@48.313,36.464
14А: DD2.5 R53.1 R55.2 | length 12.6
  Top Layer w0.2: R53.1@19.3,1.5 19.3,2.55 20.16,3.41 DD2.5@20.16,3.85 20.16,4.3 21.235,5.375 25.551,5.375 R55.2@27.975,7.799 ; R55.2@28.075,7.799 R55.2@28.075,8
14В: DD5.5 R116.1 R121.2 | length 18.5
  Top Layer w0.2: R121.2@85.485,31.18 v1@85.485,32.03 ; R116.1@85.485,34.88 v1@85.485,35.73 ; v1@85.485,35.88 89.25,39.645 89.25,44.96 87.8,46.41 DD5.5@87.35,46.41
  Bottom Layer w0.2: v1@85.485,32.18 v1@85.485,35.88
  other v1: 85.485,32.08 85.485,35.78
15_IN: R122.1 R131.1 X2.16 | length 34
  Top Layer w0.2: v1(82.68,24.78) 82.752,24.852 82.752,25.297 R122.1@86.985,29.53
  Bottom Layer w0.2: X2.16@68.985,23.31 70.455,24.78 v1(82.68,24.78)
  Bottom Layer w0.5: R131.1@62.44,33.77 62.44,32.862 62.967,32.335 62.967,32.151 63.09,32.027 63.09,31.72 68.985,25.825 X2.16@68.985,23.31
15_OUT: R56.1 VT8.7 VT8.8 X1.16 | length 71.6
  Top Layer w0.2: R56.1@34.125,8 34.125,7.725 35.122,6.728 v1(35.122,4.825)
  Bottom Layer w0.2: v1(35.122,4.825) 35.228,4.825 36.6,3.453 36.6,3.095 37.92,1.775 51.3,1.775 53.9,4.375 53.9,16.847 50.277,20.47 45.18,20.47 43.425,22.225 40.035,22.225 X1.16@38.96,23.3
  Bottom Layer w0.5: X1.16@38.96,23.3 40.785,25.125 44.168,25.125 47.705,28.662 47.705,29.326 48.243,29.864 50.285,29.864 v1(51.135,29.014) v1(52.105,29.014)
15_SIG: R72.1 R86.1 VT8.2 | length 10.2
  Top Layer w0.2: R86.1@46,42.5 R72.1@46,40.525 46.275,40.525 47.275,39.525 47.275,37.741 47.991,37.025 50.274,37.025 50.985,36.314 VT8.2@50.985,35.864
15А: DD2.6 R54.1 R56.2 | length 16
  Top Layer w0.2: R54.1@23.3,1.5 23.3,1.701 22.935,2.065 22.765,2.065 21.43,3.4 DD2.6@21.43,3.85 21.43,4.3 22.08,4.95 26.2,4.95 28.15,6.9 31.25,6.9 32.075,7.725 R56.2@32.075,8
15В: DD5.6 R117.1 R122.2 | length 19.5
  Top Layer w0.2: R122.2@86.985,31.18 v1@86.985,32.03 ; R117.1@86.985,34.88 v1@86.985,35.73 ; v1@86.985,35.88 89.65,38.545 89.65,45.83 87.8,47.68 DD5.6@87.35,47.68
  Bottom Layer w0.2: v1@86.985,32.18 v1@86.985,35.88
  other v1: 86.985,32.08 86.985,35.78
DATA1_165: DD2.9 DD12.1 | length 89.6
  Top Layer w0.2: v1(10.425,28.975) 10.425,31.05 11.867,32.492 52.317,32.492 55.425,35.6 58.431,35.6 64.631,41.799 64.631,41.904 64.827,42.1 DD12.1@65.05,42.1 ; DD2.9@23.97,9.35 23.97,9.773 24.408,10.21 24.585,10.21 v1(24.7,10.325)
  Bottom Layer w0.2: v1(10.425,28.975) 14.25,25.15 18.275,25.15 22.4,21.025 22.4,12.625 v1(24.7,10.325)
DATA1_MK: DD11.7 DD12.6 | length 8.3
  Top Layer w0.2: DD11.7@60.875,48.15 62.075,48.15 63.35,46.875 63.35,42.693 62.926,42.269 62.619,42.269 DD12.6@62.45,42.1
DATA2_165: DD5.9 DD12.3 | length 22.3
  Top Layer w0.2: DD12.3@65.05,44 66.154,44 69.4,47.246 69.4,50.227 70.073,50.9 71.384,50.9 72.159,51.675 79.241,51.675 80.016,50.9 80.72,50.9 81.4,50.22 DD5.9@81.85,50.22
DATA2_MK: DD11.8 DD12.4 | length 4.8
  Top Layer w0.2: DD11.8@60.875,47.5 61.95,47.5 62.45,47 DD12.4@62.45,44
DATA3_MK: DD11.11 DD13.6 | length 10
  Top Layer w0.2: DD11.11@66.625,46.2 67.763,46.2 69,47.437 69,50.393 69.932,51.325 71.225,51.325 DD13.6@72.3,52.4
DATA4_MK: DD11.12 DD13.4 | length 12.7
  Top Layer w0.2: DD11.12@66.625,46.85 67.847,46.85 68.6,47.603 68.6,50.575 69.325,51.3 69.325,52.75 68.978,53.097 68.978,53.862 69.665,54.55 71.773,54.55 72.023,54.3 DD13.4@72.3,54.3
DATA_164: DD3.1 DD3.2 DD11.1 R60.2 | length 56.2
  Top Layer w0.2: DD3.2@14.75,53.565 12.889,53.565 12.525,53.93 12.525,54.3 13.06,54.835 DD3.1@14.75,54.835 15.21,54.835 17.875,57.5 57.4,57.5 59.825,55.075 59.825,52.45 60.225,52.05 DD11.1@60.875,52.05
DATA_KEY: DD10.9 DD13.3 | length 36.6
  Top Layer w0.2: DD13.3@74.9,54.2 79.869,54.2 v1(79.919,54.25) ; v1(83.525,54.68) 85.97,57.125 91.481,57.125 95.524,53.081 95.524,42.201 96.395,41.33 DD10.9@97.35,41.33
  Bottom Layer w0.2: v1(79.919,54.25) 82.965,54.25 83.395,54.68 v1(83.525,54.68)
DATA_LED: DD7.1 DD7.2 DD13.1 R160.2 | length 14.5
  Top Layer w0.2: v1(73.6,52.375) 73.612,52.387 74.888,52.387 DD13.1@74.9,52.4 ; v1(74.679,48.825) 74.75,48.754 74.75,45.325 v1(74.775,45.3)
  Bottom Layer w0.2: DD7.2@73.075,43.505 74.355,43.505 75.025,44.175 R160.2@75.3,44.175 ; DD7.1@73.075,44.775 73.083,44.783 74.278,44.783 74.775,45.28 v1(74.775,45.3) 74.843,45.232 74.843,44.321 R160.2@74.99,44.175 ; v1(73.6,52.375) 74.679,51.296 v1(74.679,48.825)
GND: A1.4 C1.2 C2.2 C3.2 C4.2 C5.2 C6.2 C7.2 C8.2 C9.2 C10.2 C11.2 C12.2 C13.2 C14.2 C15.1 C16.2 C17.2 C18.2 C19.2 C20.2 C21.2 C22.2 DA1.1 DD1.8 DD1.10 DD1.15 DD2.8 DD2.15 DD3.7 DD4.8 DD4.10 DD4.15 DD5.8 DD5.15 DD6.7 DD7.7 DD8.7 DD9.7 DD10.8 DD10.10 DD10.15 DD11.5 DD12.2 DD13.2 HL25.1 HL26.1 R1.2 R2.2 R3.2 R4.2 R5.2 R6.2 R14.2 R15.2 R23.2 R24.2 R25.2 R26.2 R27.2 R28.2 R37.1 R52.1 R53.2 R54.2 R57.1 R58.2 R59.2 R60.1 R61.2 R66.2 R68.2 R70.2 R73.2 R74.2 R75.2 R88.2 R90.2 R92.2 R93.2 R94.2 R95.2 R96.2 R97.2 R104.2 R106.2 R108.2 R110.2 R112.2 R113.2 R114.2 R115.2 R116.2 R117.2 R124.2 R126.2 R128.2 R130.2 R132.2 R159.1 R160.1 R161.1 S1.2 S2.2 S3.2 S4.2 VT9.9 VT10.9 VT11.9 XP1.6 | length 25.5
  Top Layer w0.2: R132.2@62.485,33.53 62.955,34 63.772,34 ; R61.2@64.485,33.23 R117.2@86.985,33.23
  Top Layer w0.5: C15.1@57.125,49.05 C16.2@58.625,49.05
  other v1: 36.85,0.85 103.475,0.875 112.475,0.9 79.425,0.925 118.875,0.925 72.55,0.95 53.775,1 85.4,1 67.625,1.025 60.735,1.405 90.775,1.405 16.175,1.45 24.45,1.5 20.425,1.525 26.475,1.525 60.735,2.155 90.775,2.155 20.35,2.45 23.975,2.8 60.735,2.905 72.575,2.9 90.775,2.905 11.3,2.975 77.658,3.815 24.9,3.85 43.35,4.2 92.1,4.225 59.9,4.25 86.3,4.275 57.95,4.325 65.05,5.15 17.1,5.45 103.6,5.575 118.775,5.775 60.735,5.78 90.775,5.78 11.4,5.85 18.6,6.525 60.735,6.53 90.775,6.53 33.225,6.575 110.8,6.625 60.735,7.28 90.775,7.28 86.7,7.475 99.6,7.55 82.975,7.8 14.7,7.85 21.125,7.925 16.35,7.975 59.875,8.65 57.858,8.86 92.125,9.025 64.55,9.25 115.45,9.625 60.735,10.28 90.775,10.28 106.908,10.407 60.735,11.03 90.775,11.03 119.125,11.05 129.2,11.125 124.35,11.35 16.175,11.725 60.735,11.78 90.775,11.78 87.075,11.9 22.105,11.93 26.325,12.1 11.275,13.2 16.05,13.2 59.975,13.2 12.975,13.275 14,13.275 18.35,13.375 58.125,13.4 92.175,13.4 64.375,13.55 16.225,14.725 24.425,14.725 26.235,14.765 60.735,14.78 90.775,14.78 60.735,15.53 90.775,15.53 24.325,15.725 11.3,15.825 85.05,16.125 13.175,16.25 60.735,16.28 90.775,16.28 24.825,16.325 106.55,16.375 129.1,16.875 121.859,16.882 114.15,16.95 49.48,17.583 46.275,17.725 59.9,17.75 64.275,17.8 92.125,17.8 57.986,17.824 81.55,18.375 16.9,18.525 54,19.275 60.735,19.28 90.775,19.28 118.85,19.7 18.787,19.828 13.5,19.95 60.735,20.03 90.775,20.03 11.825,20.175 64.225,20.525 104.654,20.673 60.735,20.78 90.775,20.78 12.425,21.1 16.375,21.15 82.275,21.4 85.025,21.6 115.506,21.684 92.1,22.275 57.95,22.3 60.025,22.3 110.05,22.725 65.075,22.825 25.05,23.231 122.389,23.246 99.99,23.325 46.575,23.375 60.735,23.78 90.775,23.78 24.325,24 129.025,24.075 87.325,24.1 51.35,24.25 60.735,24.53 90.775,24.53 60.735,25.28 90.775,25.28 80.9,25.525 113.912,25.731 108.17,25.791 15.325,26.025 22.2,26.175 65.925,26.325 11.3,26.45 59.975,26.675 92.2,26.725 124.425,26.8 57.975,26.825 20.7,27.675 25.85,27.75 43.325,27.75 29.925,27.775 15.625,27.825 23.178,27.862 12.675,27.925 86.75,28.25 60.735,28.28 90.775,28.28 60.735,29.03 90.775,29.03 118.55,29.175 60.735,29.78 90.775,29.78 103.725,29.95 129.2,30.05 122.575,30.575 107.35,30.775 58.025,31.325 59.875,31.35 92.275,31.45 113.85,31.5 54.078,31.608 42.475,31.675 21.45,31.7 16.325,31.725 37.275,31.725 47.725,31.725 12.525,31.75 26.7,31.75 32,31.775 120.638,32.753 60.735,32.78 90.775,32.78 60.735,33.53 90.775,33.53 60.735,34.28 90.775,34.28 129.075,34.7 92.6,35.525 53.325,35.8 62.5,36 95.006,36.228 125.1,36.475 119.975,36.725 89.45,37.275 69.725,37.325 128.85,37.325 62,37.35 64.025,37.375 70.875,37.425 58.25,37.8 91.4,38.125 84.1,38.175 71.675,38.385 60.725,38.9 81.7,39.225 52.05,39.325 58.55,39.75 76.5,40.3 69.786,40.336 60.9,40.675 66.05,40.925 95.375,40.975 74.875,41.025 111,41.1 90.675,41.375 14.775,41.5 27.325,41.5 37.275,41.525 100.575,41.525 22.25,41.55 58.631,41.569 32.3,41.6 42.225,41.6 103.1,41.751 115.875,42.325 51.95,42.65 121.988,42.922 100.35,43.25 58.036,43.329 17.3,43.375 19.75,43.525 24.775,43.525 12.175,43.55 29.725,43.55 39.775,43.55 44.65,43.55 34.675,43.6 129.125,43.775 110.8,43.875 125.55,44.025 106.05,44.05 101.4,44.613 103.225,45.725 39.855,45.819 65.175,45.85 57.384,46.034 27.225,46.05 30.35,46.1 37.35,46.2 44.35,46.2 35.275,46.275 14.75,46.3 10.7,46.425 24.475,46.55 32.65,46.625 54.132,46.647 17.326,46.734 122.667,46.8 126.075,46.825 12.625,47.1 42.535,47.218 49.6,47.35 58.6,48.025 77.925,48.6 120.55,48.675 49.525,48.725 47.675,48.75 37.6,48.825 53.75,48.85 21.55,49.15 24.4,49.241 70.1,49.284 94.489,49.307 96.224,49.467 16.6,49.6 48.55,49.75 100.197,49.75 75.497,49.859 42.4,49.875 77.75,50.1 10.875,50.325 85.875,50.45 28.75,50.6 87.475,50.95 116.205,51.115 108.725,51.2 18.2,51.4 129,51.525 94.025,51.675 33.375,52.325 13.075,52.375 124.738,52.447 71.1,52.55 10.525,52.575 24.75,52.575 46.075,52.675 84.225,52.72 60.975,52.95 64.925,53.15 79.475,53.3 16.65,53.325 75.68,53.35 73.6,53.375 37.625,53.675 58.5,53.775 23.7,54.265 91.004,54.299 28.975,54.65 32.325,54.725 86.35,54.75 24.775,54.825 46.525,55.7 17.85,55.8 21.2,55.8 44.2,55.85 13,56.575 59.675,56.75 76.45,57.325 102.9,57.65 10.925,58.225 128.95,58.8 119.225,59 18.925,59.95 91.825,60.05 104.425,60.075 26.125,60.1 97.031,60.213 38.825,60.275 110.163,60.307 88.95,60.4 33.225,60.55 69.475,60.625 79.275,61.3 64.75,61.35 77.425,61.425 53.3,61.85 109.625,61.875 71.804,61.974 58.099,62.207 66.375,62.325 45.8,63.05 50.65,63.1 42.95,63.475 39.762,63.592 36.2,63.9 13.125,63.95 17.75,64.175 94.875,64.275 69.275,64.975 89.275,64.975 73.275,65 79.25,65 61.275,65.025 65.25,65.025 85.225,65.025 109.125,65.225 116.15,65.55 33.95,65.6 91.775,65.725 19.35,66.325 42.325,67.325 76.116,67.731 40.025,67.825 12.85,68.025 72.383,68.104 95.375,68.35 104.8,68.725 110.325,68.85 37.125,68.875 118.525,68.9 26.2,69.025 33.9,69.05 74.55,69.15
NetA1_1: A1.1 X5.3 | length 43
  Bottom Layer w1: X5.3@2.25,12.75 6.05,16.55 6.05,28.245 7,29.195 7,34.075 3.5,37.575 A1.1@3.5,52.3
NetA1_2: A1.2 X5.1 | length 9.3
  Top Layer w1: X5.1@2.25,22.75 2.25,30.034 3.5,31.284 A1.2@3.5,31.5
NetC17_1: C17.1 DD10.11 R165.2 | length 10.9
  Top Layer w0.2: R165.2@93.75,39.425 93.993,39.668 94.618,39.668 95.2,40.25 96.559,40.25 96.959,40.65 98.669,40.65 99.85,41.831 99.85,42.4 99.275,42.975 C17.1@99.275,43 98.45,43 97.958,43.492 97.958,43.674 97.762,43.87 DD10.11@97.35,43.87
NetC18_1: C18.1 DD10.12 R166.2 | length 13.4
  Top Layer w0.2: R166.2@96,39.425 96.3,39.425 97.125,40.25 98.834,40.25 99.234,40.65 100.744,40.65 101.625,41.531 101.625,43.5 101.175,43.95 100.05,43.95 99.275,44.725 C18.1@99.275,44.75 99,45.025 97.465,45.025 DD10.12@97.35,45.14